# EAGLE board Daring Allis-Elzing (EAGLE 9.7.0)

Size 122.28 x 118.25 mm. Coordinates in mm from the lower left corner, seen from the top.
Outline: 0,0 122.28,0 122.28,118.25 0,118.25 0,0
Copper layers (1*16): Top 0.035mm / dielectric 1.5mm / Bottom 0.035mm
Design rules "default": minimum track width 6mil, minimum drill 0.35mm, track to track 6mil, track to pad 6mil, pad to pad 6mil, via to via 6mil, smd to smd 6mil, copper to edge 40mil, drill to drill 6mil, minimum pad ring 10mil, minimum via ring 8mil, stop-mask expansion 4mil, vias tented up to drill 0mil, thermal gap 10mil

## Footprints (pad centres in the part's own frame; a part is rotated, then mirrored left to right if it is on the bottom)
7SEG-13 = drill 0.813 long: 1 -5.08,-7.62; 2 -2.54,-7.62; 3 0,-7.62; 4 2.54,-7.62; 5 5.08,-7.62; 6 5.08,7.62; 7 2.54,7.62; 8 0,7.62; 9 -2.54,7.62; 10 -5.08,7.62
1X08 = drill 1.016 long: 1 -8.89,0; 2 -6.35,0; 3 -3.81,0; 4 -1.27,0; 5 1.27,0; 6 3.81,0; 7 6.35,0; 8 8.89,0
RESAD1016W63L850D250B = drill 0.83 pad 1.43: 1 -5.08,0; 2 5.08,0
TO92 = drill 0.813 octagon: 1 -1.27,0; 2 0,1.905; 3 1.27,0
ARDUINO-UNO-R3-SHIELD = drill 1.016 pad 1.88: 3.3V 24.13,-2.54; 5V 24.13,0; A0 24.13,12.7; A1 24.13,15.24; A2 24.13,17.78; A3 24.13,20.32; A4 24.13,22.86; A5 24.13,25.4; AREF -24.13,-13.97; D2 -24.13,20.32; D3 -24.13,17.78; D4 -24.13,15.24; D5 -24.13,12.7; D6 -24.13,10.16; D7 -24.13,7.62; D8 -24.13,3.81; D9 -24.13,1.27; D10 -24.13,-1.27; D11 -24.13,-3.81; D12 -24.13,-6.35; D13 -24.13,-8.89; GND@0 24.13,2.54; GND@1 24.13,5.08; GND@2 -24.13,-11.43; IOREF 24.13,-7.62; NC 24.13,-10.16; RES 24.13,-5.08; RX -24.13,25.4; SCL -24.13,-19.05; SDA -24.13,-16.51; TX -24.13,22.86; VIN 24.13,7.62

## Placement (x,y rotation side)
DIGIT1  7SEG-CA  [7SEG-13]  74.91,94.04 0 top
DIGIT2  7SEG-CA  [7SEG-13]  87.61,94.04 0 top
DIGIT3  7SEG-CA  [7SEG-13]  100.31,94.04 0 top
DIGIT4  7SEG-CA  [7SEG-13]  113.01,94.04 0 top
JP1  PINHD-1X08_1X08M  [1X08]  93.31,44.92 270 top
JP2  PINHD-1X08_1X08M  [1X08]  96.21,44.92 270 top
R1  220  [RESAD1016W63L850D250B]  36.81,109.28 90 top
R2  220  [RESAD1016W63L850D250B]  26.65,109.28 90 top
R3  220  [RESAD1016W63L850D250B]  16.49,109.28 90 top
R4  220  [RESAD1016W63L850D250B]  6.33,109.28 90 top
R5  220  [RESAD1016W63L850D250B]  39.35,91.5 90 top
R6  220  [RESAD1016W63L850D250B]  29.19,91.5 90 top
R7  220  [RESAD1016W63L850D250B]  19.03,91.5 90 top
R8  220  [RESAD1016W63L850D250B]  8.87,91.5 90 top
T1  NPN  [TO92]  8.87,99.12 0 top
T2  NPN  [TO92]  19.03,99.12 0 top
T3  NPN  [TO92]  29.19,99.12 0 top
T4  NPN  [TO92]  39.35,99.12 0 top
U1  ARDUINO-UNO-R3-SHIELD  [ARDUINO-UNO-R3-SHIELD]  51.36,29.84 270 top

## Library data of the parts
DIGIT1-DIGIT4 = Tinkercad; CATEGORY: Opto-Electronic; SUB-CATEGORY: Display; TYPE: 7-Segment
JP1 JP2 R1-R8 U1 = Tinkercad
T1-T4 = Tinkercad; CATEGORY: Transistor; SUB-CATEGORY: BJT; TYPE: NPN

## Nets
DIGIT2_A: DIGIT2.7 JP1.1
DIGIT2_B: DIGIT2.6 JP2.3
DIGIT2_C: DIGIT2.4 JP2.2
DIGIT2_CA1: DIGIT2.3 JP1.3
DIGIT2_CA2: DIGIT2.8 T1.3
DIGIT2_DP: DIGIT2.5 JP2.4
DIGIT3_CA1: DIGIT3.3 T4.3
DIGIT3_CA2: DIGIT3.8 JP2.1
DIGIT3_D: DIGIT3.2 JP1.4
DIGIT3_E: DIGIT3.1 JP1.2
DIGIT3_F: DIGIT3.9 T3.3
DIGIT3_G: DIGIT3.10 T2.3
R4_2: R1.2 R2.2 R3.2 R4.2
T1_B: R8.2 T1.2
T1_C: R4.1 T1.1
T2_B: R7.2 T2.2
T2_C: R3.1 T2.1
T3_B: R6.2 T3.2
T3_C: R2.1 T3.1
T4_B: R5.2 T4.2
T4_C: R1.1 T4.1
U1_D9: R5.1 U1.D9
U1_D10: R6.1 U1.D10
U1_D11: R7.1 U1.D11
U1_D12: R8.1 U1.D12

## Tracks (layer width: path | path; a pad name or v marks a point on that pad's centre or on a via)
DIGIT2_A  (1 unrouted)
DIGIT2_B  (1 unrouted)
DIGIT2_C  (1 unrouted)
DIGIT2_CA1  (1 unrouted)
DIGIT2_CA2  (1 unrouted)
DIGIT2_DP  (1 unrouted)
DIGIT3_CA1  (1 unrouted)
DIGIT3_CA2  (1 unrouted)
DIGIT3_D  (1 unrouted)
DIGIT3_E  (1 unrouted)
DIGIT3_F  (1 unrouted)
DIGIT3_G  (1 unrouted)
R4_2  (3 unrouted)
T1_B  (1 unrouted)
T1_C  (1 unrouted)
T2_B  (1 unrouted)
T2_C  (1 unrouted)
T3_B  (1 unrouted)
T3_C  (1 unrouted)
T4_B  (1 unrouted)
T4_C  (1 unrouted)
U1_D9  (1 unrouted)
U1_D10  (1 unrouted)
U1_D11  (1 unrouted)
U1_D12  (1 unrouted)